# Altium PCB Oct_Ribbon_V2.1_PCB.PcbDoc
Units mil, origin at the board's own origin, x right, y up, seen from the top; angles counter-clockwise.
Board outline 7969.5 x 4201.11 mil, 2 copper layers (Top Layer, Bottom Layer), stack 3.556 mil thick; 9 components, 11 nets, 96 pads, 42 vias.
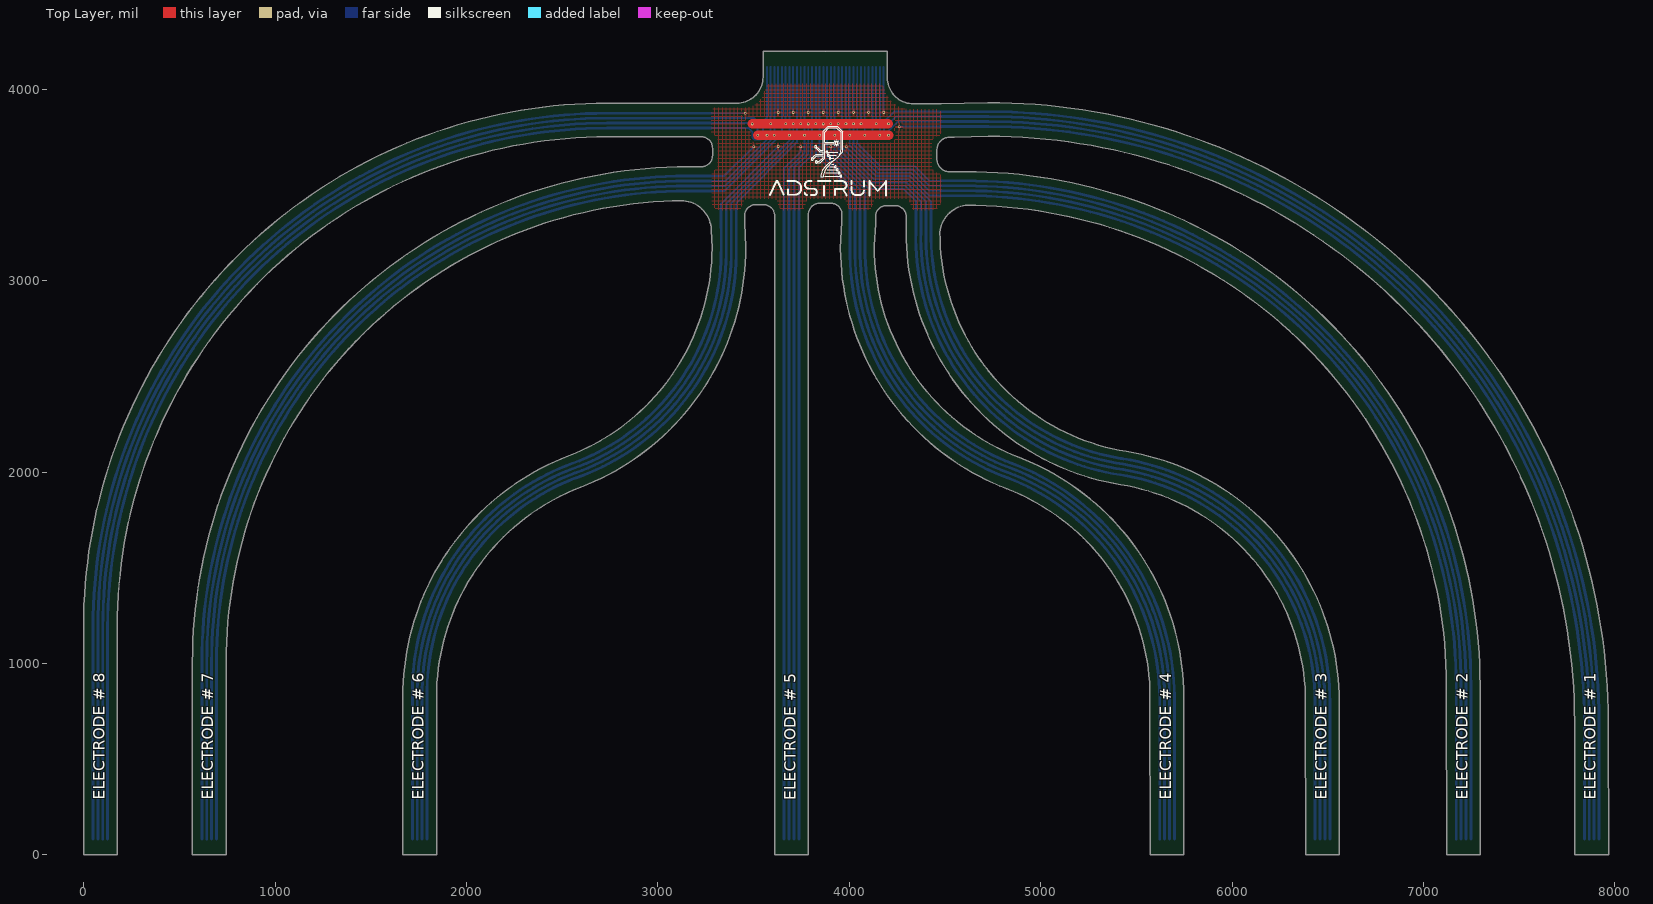
[diagram p0: Top Layer view]
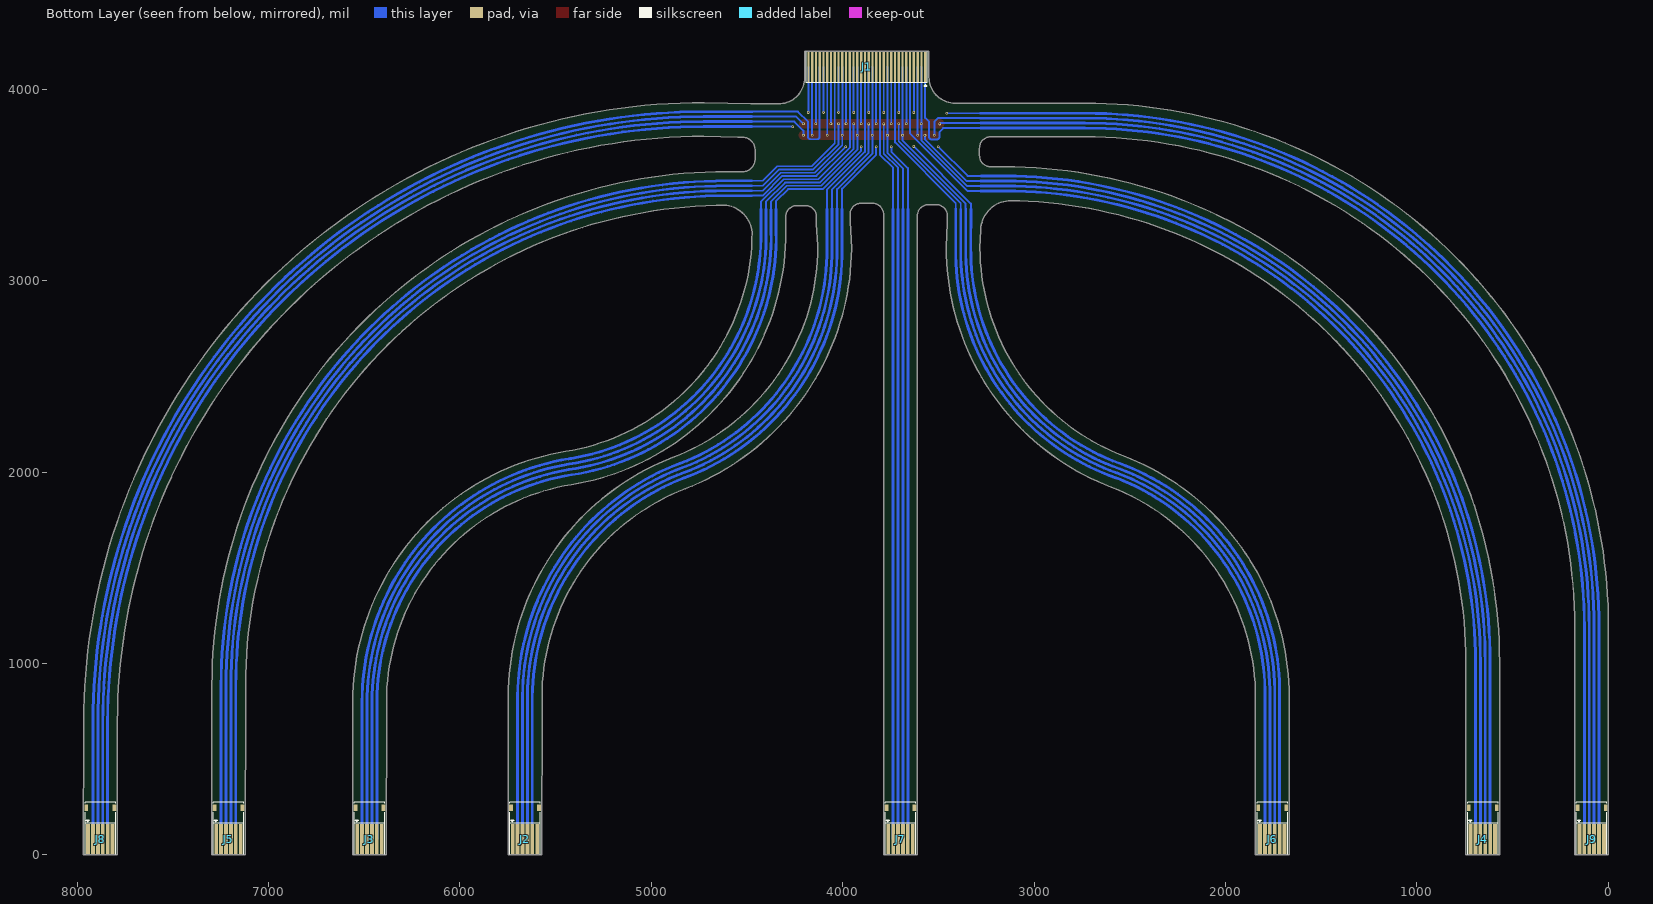
[diagram p1: Bottom Layer view, seen from below]

## Layer stack, top to bottom
Top Solder: solder mask 0.5, Solder Resist, Dk 3.5
Top Layer: signal copper 1.378
Dielectric 1: dielectric 0.8, Flex, Dk 4.8
Bottom Layer: signal copper 1.378
Bottom Solder: solder mask 0.5, Solder Resist, Dk 3.5

## Board outline
743.08,0 743.08,1006.64 cw(c3156.39,1006.64) 3029.41,3416.61 cw(c3135.6,1006.77) 3120.36,3418.9 cw(c3121.35,3261.42) 3278.7,3267.85 3282.62,3171.79 cw(c2116.54,3174.97) 2533.79,2086.08 ccw(c3016.89,825.47) 1666.88,825.51 1666.88,0 1842.86,0 1842.86,825.5 cw(c3016.88,825.47) 2596.76,1921.75 ccw(c2116.54,3174.97) 3458.61,3173.5 3458.61,3175.24 3453.4,3302.84 3452.99,3346.46 cw(c3511.62,3339.41) 3511.62,3398.47 3551.03,3398.47 cw(c3551.03,3339.41) 3609.67,3346.46 3610.09,3344.88 3610.09,3339.88 3610.09,3339.41 3610.09,3323.88 3610.36,0 3786.35,0 3786.07,3310.24 3786.07,3349.92 3786.49,3353.86 cw(c3845.13,3346.82) 3845.13,3405.87 3903.08,3405.87 cw(c3903.08,3346.82) 3961.72,3353.86 3961.39,3310.24 3953.59,3170.34 3953.62,3167.34 ccw(c5310.56,3179.68) 4823.31,1913.18 4823.43,1913.14 cw(c4406.69,825.69) 5571.26,827.67 5572.7,0 5748.68,0 5747.24,827.97 ccw(c4406.69,825.69) 4886.4,2077.47 cw(c5310.56,3179.68) 4151.19,2954.66 cw(c5319.47,3175.16) 4130.56,3175.16 4130.59,3183.58 4136.96,3297.97 4136.96,3334.32 cw(c4196.02,3334.32) 4196.02,3393.38 4238.96,3393.38 cw(c4238.96,3334.32) 4298.02,3334.32 4298.02,3290.7 4297.91,3290.7 4297.39,3253.32 ccw(c5633.83,3253.83) 5419.11,1934.75 cw(c5234.41,800.09) 6384.01,802.1 6385.41,0 6561.39,0 6559.99,802.41 ccw(c5234.41,800.09) 5447.39,2108.45 cw(c5633.83,3253.83) 4473.38,3253.39 cw(c4630.2,3238.95) 4606.86,3394.69 cw(c4607.41,881.5) 7120.6,885.94 7122.16,0 7298.15,0 7296.58,886.25 ccw(c4607.41,881.5) 4606.83,3570.68 4606.83,3570.69 4548.17,3569.73 4519.8,3569.73 cw(c4525.88,3637.78) 4457.56,3637.78 4457.56,3682.72 cw(c4525.88,3682.72) 4519.96,3750.79 4548.17,3750.79 4726.09,3755.33 cw(c4725.78,690.68) 7790.42,696.04 7791.63,0 7967.62,0 7966.4,696.35 ccw(c4725.78,690.68) 4724.88,3931.31 4723.83,3931.31 4479.16,3925.07 4335.09,3925.07 cw(c4335.09,4061.19) 4198.97,4061.19 4198.97,4201.11 3549.25,4201.11 3549.25,4064.99 cw(c3413.13,4064.99) 3413.13,3928.87 2735.15,3928.87 ccw(c2735.1,1191.9) -1.88,1191.9 -1.88,0 174.1,0 174.1,1191.9 cw(c2735.1,1191.9) 2735.15,3752.89 3226.07,3752.89 cw(c3226.07,3693.83) 3285.13,3693.83 3285.13,3654.99 cw(c3226.07,3654.99) 3226.07,3595.94 3156.35,3595.94 ccw(c3156.39,1006.64) 567.1,1006.64 567.1,0

## Design rules (kind name [scope] priority, off if disabled: settings)
Clearance [All] p1: gap=10 ignorepadtopadclearanceinfootprint=FALSE except(0: Arc-Hole Track-Hole SMDPad-Hole THPad-Hole Via-Hole Fill-Hole Poly-Hole Region-Hole Text-Hole; 4: Arc-SMDPad Track-SMDPad SMDPad-SMDPad; 7: Arc-Arc Arc-Track Arc-THPad Arc-Via Arc-Text Track-Track Track-THPad Track-Via Track-Text SMDPad-THPad SMDPad-Via SMDPad-Text THPad-THPad THPad-Via THPad-Text Via-Via Via-Text Fill-Text Poly-Text Region-Text Text-Text)
PolygonConnect [All] p1: connectstyle=Relief reliefconductorwidth=10 reliefentries=4 polygonreliefangle="90 Angle" airgapwidth=10
RoutingVias [All] p1: holewidth=11.81 width=23.62 viastyle="Through Hole" minholewidth=7.87 minwidth=13.78 maxholewidth=31.5 maxwidth=62.99
SilkToSilkClearance [All] p1: silktosilkclearance=0
SilkToSolderMaskClearance [IsPad] p1: minsilkscreentomaskgap=0 clearancetoexposedcopper=TRUE
SolderMaskExpansion [All] p1: expansion=4 istentingtop=FALSE
Width [All] p1: maxlimit=50 minlimit=10 preferedwidth=15 minimp=50.000000 maximp=50.000000 favimp=50.000000
28 further rules are at their usual default settings.

## Components (designator, comment, footprint, x,y, rotation, side; value= is the part's Value field where it differs from the comment)
J1 "32 pin Ribbon Pads" "32 pin Ribbon Pads." 3874.12,4118.1 r180 bottom locked
J2 "For Ribbon Cable" "6 PIN RIBBON PADS 0.65MM PITCH" 5660.5,82.5 r0 bottom locked
J3 "For Ribbon Cable" "6 PIN RIBBON PADS 0.65MM PITCH" 6473,82.5 r0 bottom locked
J4 "For Ribbon Cable" "6 PIN RIBBON PADS 0.65MM PITCH" 654.98,82.5 r0 bottom locked
J5 "For Ribbon Cable" "6 PIN RIBBON PADS 0.65MM PITCH" 7210,82.5 r0 bottom locked
J6 "For Ribbon Cable" "6 PIN RIBBON PADS 0.65MM PITCH" 1754.98,82.5 r0 bottom locked
J7 "For Ribbon Cable" "6 PIN RIBBON PADS 0.65MM PITCH" 3698,82.5 r0 bottom locked
J8 "For Ribbon Cable" "6 PIN RIBBON PADS 0.65MM PITCH" 7879.5,82.5 r0 bottom locked
J9 "For Ribbon Cable" "6 PIN RIBBON PADS 0.65MM PITCH" 86,82.5 r0 bottom locked

## Footprints (in the part's own frame and the unit in brackets; to place one, negate y for a bottom-side part, rotate by r counter-clockwise, add the part's x,y. Pads: shape width x height; smd on the part's side, far side on the other; paste and mask are expansions set on the pad)
"6 PIN RIBBON PADS 0.65MM PITCH" [mm]
  rect 0.5x4 smd: 1(1.625,0) 2(0.975,0) 3(0.325,0) 4(-0.325,0) 5(-0.975,0) 6(-1.625,0)
  silkscreen extent -2.02,-2.51 2.02,2.01
"32 pin Ribbon Pads." [mm]
  rect 0.3x4 smd: 1(7.75,0) 2(7.25,0) 3(6.75,0) 4(6.25,0) 5(5.75,0) 6(5.25,0) 7(4.75,0) 8(4.25,0) 9(3.75,0) 10(3.25,0) 11(2.75,0) 12(2.25,0) 13(1.75,0) 14(1.25,0) 15(0.75,0) 16(0.25,0) 17(-0.25,0) 18(-0.75,0) 19(-1.25,0) 20(-1.75,0) 21(-2.25,0) 22(-2.75,0) 23(-3.25,0) 24(-3.75,0) 25(-4.25,0) 26(-4.75,0) 27(-5.25,0) 28(-5.75,0) 29(-6.25,0) 30(-6.75,0) 31(-7.25,0) 32(-7.75,0)
  silkscreen extent -8.04,-2.54 8.04,2.01

## Part data
J1: "Ribbon wire Connection Pads"
J2 J3 J4 J5 J6 J7 J8 J9: library part "6 pin Ribbon Pads", "Ribbon wire Connection Pads 0.65mm Pitch"

## Free pads (board coordinates)
  rect 20x35 smd far side: ""(12.7,246) ""(159.5,246) ""(581.68,246) ""(728.48,246) ""(1681.68,246) ""(1828.48,246) ""(3624.7,246) ""(3771.5,246) ""(5587.2,246) ""(5734,246) ""(6399.7,246) ""(6546.5,246) ""(7136.7,246) ""(7283.5,246) ""(7806.2,246) ""(7953,246)

## Via types
v1: diameter 13.78, hole 7.87, Top Layer to Bottom Layer, 42 vias

## Nets (pads, with @x,y where several pads share a name; then routed paths per layer and width w, separated by ;. In a path a pad name is that pad's centre, name@x,y a point inside that pad or via, vN(x,y) a via of type N, cw(c..) or ccw(c..) an arc to the next point about the centre after c; other vN are vias at no path point)
GND: J1.4 J1.8 J1.12 J1.16 J1.20 J1.24 J1.28 J1.32 J2.5 J3.5 J4.5 J5.5 J6.5 J7.5 J8.5 J9.5 | length 42232.3
  Bottom Layer w10: 3278,3548 3347.45,3548 v1(3500,3700.55) ; 3280,3876 v1(3457,3876) ; 3330.04,3375.44 3330.04,3404.24 v1(3628.19,3702.39) ; v1@3628.06,3880 J1.4 ; 3659.61,3374.38 3659.61,3589.61 3745.75,3675.75 v1(3745.75,3700.55) ; v1@3706.8,3880 J1.8 ; v1@3785.54,3880 J1.12 ; v1@3824.91,3700 3824.91,3660.09 4003.29,3481.71 4003.29,3375.8 ; v1@3864.28,3880 J1.16 ; v1(3903.78,3700) 3903.78,3680.22 4104,3480 4285,3480 4347.61,3417.39 4347.61,3375.09 ; v1@3943.02,3880 J1.20 ; v1(3984.4,3701.48) 3984.48,3701.48 4137.96,3548 4316.04,3548 4419.04,3445 4475.01,3445 ; v1@4021.76,3880 J1.24 ; v1(4100.5,3880) J1.28 ; v1@4179.24,3880 J1.32 ; v1(4261,3805) 4262,3806 4474.3,3806
  Bottom Layer w15: J9.5 47.88,1191.9 cw(c2733.49,1190.39) 2735,3876 3280,3876 ; J4.5 616.59,1007 cw(c3153.8,1010.8) 3150,3548 3278,3548 ; J6.5 1716.59,831.06 cw(c2994.23,847.3) 2589.64,2059.29 ccw(c2141.08,3161.03) 3330.57,3173.15 3330.04,3375.44 ; J7.5 3659.61,3374.38 ; 4003.29,3375.8 4003.29,3167.18 ccw(c5265.94,3154.52) 4795.5,1982.71 cw(c4380.57,812.46) 5622.11,828.02 J2.5 ; 4347.61,3375.09 4347.61,3253.58 ccw(c5604.74,3229.25) 5379.16,1992.29 cw(c5225.27,792.7) 6434.61,805.97 J3.5 ; 4474.3,3806 4726,3806 cw(c4728.56,693.44) 7841.11,696 J8.5 ; 4475.01,3445 4607,3445 cw(c4609.81,883.19) 7171.61,886 J5.5
  other v1: 3825.04,3700 3628.19,3880 3706.93,3880 3785.67,3880 3864.41,3880 3943.15,3880 4021.89,3880 4179.37,3880
Measure1: J1.1 J9.2 | length 6443
  Bottom Layer w10: 3280,3798 3475,3798 3494,3779 3494,3754 ccw(c3509,3754) 3509,3739 3534,3739 ccw(c3534,3754) 3549,3754 3549,3832 3569,3852 J1.1
  Bottom Layer w15: J9.2 124.39,1192 cw(c2732.69,1189.69) 2735,3798 3280,3798
Measure2: J1.5 J4.2 | length 5759.3
  Bottom Layer w10: 3280,3470 3349.12,3470 3647.74,3768.62 J1.5
  Bottom Layer w15: J4.2 693.36,1007 cw(c3153.18,1010.18) 3150,3470 3280,3470
Measure3: J1.9 J6.2 | length 4859.8
  Bottom Layer w10: 3409.15,3374.73 3409.15,3406.15 3726.48,3723.48 J1.9
  Bottom Layer w15: J6.2 1793.36,827.01 cw(c2999.67,842.68) 2606.36,1983.18 ; 2606.36,1983.18 ccw(c2158.49,3151.02) 3409.15,3168.02 3409.15,3374.73
Measure4: J1.13 J7.2 | length 4064.1
  Bottom Layer w10: 3736.39,3374.38 3736.39,3591.39 3805.22,3660.22 J1.13
  Bottom Layer w15: J7.2 3736.39,3374.38
Measure5: J1.17 J2.2 | length 4802.1
  Bottom Layer w10: J1.17 3883.96,3674.04 4082.5,3475.5 4082.5,3375.09
  Bottom Layer w15: 4082.5,3375.09 4082.5,3167.92 ccw(c5278.21,3161.68) 4815.13,2059.26 cw(c4383.44,816.59) 5698.89,831 J2.2
Measure6: J1.21 J3.2 | length 5387.2
  Bottom Layer w10: J1.21 3962.7,3696.47 4128.17,3531 4309,3531 4427.08,3412.92 4427.08,3374.38
  Bottom Layer w15: 4427.08,3374.38 4427.08,3255.87 ccw(c5608.87,3238.71) 5416.57,2072.54 cw(c5224.21,799.82) 5432.91,2069.97 cw(c5224.21,799.82) 6511.39,802.01 J3.2
Measure7: J1.25 J5.2 | length 5995.2
  Bottom Layer w10: J1.25 4041.44,3718.56 4161,3599 4341,3599 4417,3523 4475.72,3523
  Bottom Layer w15: 4475.72,3523 4607,3523 cw(c4609.19,883.81) 7248.39,886 J5.2
Measure8: J1.29 J8.2 | length 6709.3
  Bottom Layer w10: J1.29 4120.18,3753.82 ccw(c4134,3753.82) 4134,3740 4167.25,3740 ccw(c4167.25,3753.75) 4181,3753.75 4181,3831 4234,3884 4474.3,3884
  Bottom Layer w15: 4474.3,3884 4726,3884 cw(c4727.94,694.06) 7917.89,696 J8.2
VCC_3V3: J1.3 J1.7 J1.11 J1.15 J1.19 J1.23 J1.27 J1.31 J2.4 J3.4 J4.4 J5.4 J6.4 J7.4 J8.4 J9.4 | length 44509.6
  Top Layer w50: v1@3521.89,3760 v1(3608.65,3760) v1(3687.24,3760) v1(3765.98,3760) v1(3844.72,3760) v1(3923.46,3760) v1(4002.2,3760) v1@4158,3760 ; v1@4160,3760 v1(4205,3760)
  Bottom Layer w10: 3280,3522 3353.04,3522 3569.28,3738.24 3569.28,3759.28 v1(3570,3760) ; 3280,3850 3503,3850 3521,3832 v1(3521,3760.89) ; 3357.23,3374.73 3357.23,3403.23 3687.24,3733.24 v1(3687.24,3760) ; J1.3 3608.52,4117.95 v1@3608.52,3760 ; 3685.2,3375.09 3685.2,3588.29 3765.98,3669.07 3765.98,3759.87 3765.85,3760 3765.92,3760.07 J1.11 J1.11 ; v1@3687.11,3760 J1.7 ; J1.15 3844.66,4118.03 3844.66,3760.07 3844.59,3760 3844.72,3759.87 3844.72,3664.32 4029.59,3479.45 4029.59,3377.92 ; v1@3923.23,3759.77 3923.46,3759.54 3923.46,3685.54 4112,3497 4293,3497 4373.83,3416.17 4373.83,3373.67 ; 3923.33,3830 J1.19 ; v1(3923.46,3760) 3923.46,3827.46 ; J1.23 4002.07,3760 4002.2,3759.87 4002.2,3733.39 4002.2,3707.8 4145,3565 4325,3565 4419,3471 4475.72,3471 ; v1@4080.81,3760 J1.27 ; v1(4159,3761) 4159.55,3761.55 J1.31 ; v1(4205,3760) 4205.3,3760.3 4205.3,3785.3 4252,3832 4474.3,3832
  Bottom Layer w15: J9.4 73.2,1192 cw(c2733.1,1190.1) 2735,3850 3280,3850 ; J4.4 642.18,1007 cw(c3153.59,1010.59) 3150,3522 3280,3522 ; J6.4 1742.18,828.03 cw(c2997.06,844.09) 2589.41,2031.02 ccw(c2146.78,3157.77) 3357.23,3174.59 3357.23,3374.73 ; J7.4 3685.2,3375.09 ; 4029.59,3377.92 4029.59,3167.95 ccw(c5270.19,3157.24) 4792.75,2012.15 cw(c4383.83,816.16) 5647.7,830.98 J2.4 ; 4373.83,3373.67 4373.83,3256.62 ccw(c5605.18,3232.69) 5393.29,2019.48 cw(c5223.1,794.13) 6460.2,798.24 J3.4 ; 4474.3,3832 4726,3832 cw(c4728.35,693.65) 7866.7,696 J8.4 ; 4475.72,3471 4607.01,3471 cw(c4609.6,883.4) 7197.2,886 J5.4
  other v1: 4080.94,3760
VREF: J1.2 J1.6 J1.10 J1.14 J1.18 J1.22 J1.26 J1.30 J2.3 J3.3 J4.3 J5.3 J6.3 J7.3 J8.3 J9.3 | length 44285.9
  Top Layer w50: v1(3492,3820) 3492.3,3820.3 v1(3667.56,3820.3) ; v1@3667.56,3820 v1(3785.67,3820) v1(3864.41,3820) 4204.3,3820 v1@4204.3,3820.3
  Bottom Layer w10: 3280,3496 3351.08,3496 3588.89,3733.81 v1(3588.89,3820.3) 3588.79,3820.4 3588.79,4118 J1.2 ; 3280,3824 3488,3824 v1(3492,3820) ; 3383.29,3374.38 3383.29,3405.25 3706.93,3728.89 v1@3706.93,3820.17 ; v1@3667.43,3820.3 J1.6 ; 3710.8,3374.38 3710.8,3589.84 3785.67,3664.71 v1@3785.67,3819.87 ; v1@3746.17,3820.3 J1.10 ; v1@3824.91,3820.3 J1.14 ; v1@3864.28,3820 3864.41,3819.87 3864.41,3668.67 4056.16,3476.92 4056.16,3377.21 ; v1@3903.65,3820.3 J1.18 ; v1@3943.15,3820.17 3943.15,3690.85 4120,3514 4301,3514 4400.1,3414.9 4400.1,3374.38 ; v1@3982.39,3820.3 J1.22 ; v1@4021.76,3820.3 4021.76,3714.2 4153.96,3582 4332.04,3582 4417.04,3497 4475.72,3497 ; v1@4061.13,3820.3 J1.26 ; v1@4139.87,3820.3 J1.30 ; v1(4205,3820.3) 4242.7,3858 4474.3,3858
  Bottom Layer w15: J9.3 98.8,1192 cw(c2732.9,1189.9) 2735,3824 3280,3824 ; J4.3 667.77,1007.42 cw(c3153.68,1010.09) 3151,3496 3280,3496 ; J6.3 1767.77,828.03 cw(c2997.86,843.89) 2600.93,2008.28 ccw(c2152.69,3154.37) 3383.29,3161.69 3383.29,3374.38 ; J7.3 3710.8,3374.38 ; 4056.16,3377.21 4056.16,3166.45 ccw(c5274.8,3159.72) 4796.69,2038.76 cw(c4385.6,818.36) 5673.3,832.96 J2.3 ; 4400.1,3374.38 4400.1,3255.16 ccw(c5608.05,3236.85) 5393.62,2047.94 cw(c5223.87,800.17) 6172.69,1628.11 cw(c5215.72,793.06) 6485.8,792.24 J3.3 ; 4474.3,3858 4726,3858 cw(c4728.15,693.85) 7892.3,696 J8.3 ; 4475.72,3497 4607,3497 cw(c4609.4,883.6) 7222.8,886 J5.3
  other v1: 3706.93,3820.3 3746.3,3820.3 3825.04,3820.3 3903.78,3820.3 3943.15,3820.3 3982.52,3820.3 4021.89,3820.3 4061.26,3820.3 4140,3820.3
pads on no net: J2.1 J2.6 J3.1 J3.6 J4.1 J4.6 J5.1 J5.6 J6.1 J6.6 J7.1 J7.6 J8.1 J8.6 J9.1 J9.6

## Polygon pours and split planes (outlines as drawn)
GND on Top Layer "GND_L01_P000" (hatched 90Degree grid 20 track 5, pour order 0): 3278.7,3884.7 cw(c3297.8,3884.7) 3297.8,3903.8 3426.86,3903.8 ccw(c3443.56,4020.47) 3560.28,4004.07 cw(c3589.99,4000) 3590,4030 4157,4030 cw(c4144.86,3985.36) 4181.4,4013.74 ccw(c4319.53,4036.5) 4340,3898 4457.56,3898 cw(c4459.79,3877.79) 4480,3880 4480,3810 4480,3780 cw(c4450.06,3779.97) 4471.25,3758.82 ccw(c4471.37,3717.45) 4430,3717.43 4430,3608.14 ccw(c4469.96,3604.09) 4466.1,3564.1 cw(c4456.76,3541.49) 4479.38,3550.83 4479.38,3525.25 cw(c4434.93,3520.62) 4479.62,3520.38 4479.62,3483.9 cw(c4461.34,3480.13) 4480,3480 4480,3420 cw(c4430.02,3419.98) 4430,3370 4350,3370 cw(c4349.99,3399.99) 4320,3400 ccw(c4290.01,3400.01) 4290,3430 4140,3430 ccw(c4149.97,3403.56) 4121.77,3401.77 cw(c4090.02,3401.75) 4090,3370 4020,3370 cw(c4019.99,3401.77) 3988.23,3401.77 ccw(c3959.05,3402.25) 3968.06,3430 3800,3430 ccw(c3799.98,3400.02) 3770,3400 cw(c3740.02,3399.98) 3740,3370 3660,3370 cw(c3659.99,3399.99) 3630,3400 ccw(c3600.01,3400.01) 3600,3430 3470,3430 ccw(c3469.98,3400.02) 3440,3400 cw(c3410.02,3399.98) 3410,3370 3330,3370 cw(c3329.99,3419.99) 3280,3420 3280,3560 cw(c3300,3560) 3285.86,3574.14 ccw(c3282.43,3604.71) 3313,3608.14 3313,3733 ccw(c3281.22,3733.82) 3291.2,3764 cw(c3301.13,3784.42) 3278.7,3788 3278.7,3810

## Silkscreen, mask and mechanical layers (free items; w line width, h text height)
Top Overlay:
  circle w5: c3824.54,3700.69 r6
  circle w5: c3806.6,3636.39 r6
  circle w5: c3827.86,3621.37 r6
  circle w5: c3926.94,3595.47 r5
  circle w5: c3937.93,3580.55 r5
  circle w5: c3946.57,3564.07 r5
  circle w5: c3955.99,3547.58 r5
  circle w5: c3932.99,3719.5 r7.5
  circle w5: c3882.65,3673.19 r5
  circle w5: c3889.65,3656.7 r5
  circle w5: c3898.97,3641 r5
  lines w3: 3874.11,4201.11 3874.11,4201.11
  lines w5: 3806.6,3642.39 3817.6,3653.39 3826.6,3662.39 3862.6,3662.39 3862.6,3674.54 3847.5,3674.54 3844.45,3674.54 3837.6,3681.39 3826.6,3693.39 ; 3812.6,3636.39 3830.36,3654.15 3830.51,3654.15 3862.6,3654.15 3862.6,3643.66 3843.45,3624.51 3833.6,3624.51 ; 3831.6,3699.39 3847.78,3682.21 ; 3833.6,3617.28 3847.49,3617.28 3861.6,3631.39 3870.65,3640.44 3870.65,3645.36 3870.65,3715.39 3917.92,3715.39 3919.07,3716.55 ; 3855.61,3682.21 3847.78,3682.21 ; 3871.72,3547.58 3950.99,3547.58 ; 3876.43,3564.07 3941.57,3564.07 ; 3884.28,3579.77 3932.99,3579.77 ; 3887.65,3673.19 3940.8,3673.19 ; 3894.65,3656.7 3932.95,3656.7 ; 3898.41,3595.47 3921.94,3595.47 ; 3903.97,3641 3918.03,3641 ; 3909.4,3609.6 3919.6,3609.6 ; 3918.98,3717.03 cw(c3932.99,3719.5) 3918.98,3721.97 ; 3919.07,3722.46 3919,3722.39 3918,3723.39 3870.65,3723.39 3870.65,3777.44 3893.6,3800.39 3932.76,3800.39 3956.89,3775.77 3956.89,3685.75 cw(c3905.34,3685.75) 3941.8,3649.3 ; 3921.52,3711.47 ccw(c3932.99,3719.5) 3924.96,3708.04 ; 3921.52,3727.53 cw(c3932.99,3719.5) 3924.96,3730.97 ; 3926.27,3635.48 3897.52,3619.58 3873.93,3597.57 ccw(c3927.85,3543.65) 3851.6,3543.65 3864.65,3543.65 cw(c3939.51,3543.65) 3886.58,3596.59 3911.36,3621.37 3941.59,3648.85 ; 3930.52,3705.5 ccw(c3932.99,3719.5) 3935.46,3705.5 ; 3930.52,3733.51 cw(c3932.99,3719.5) 3935.46,3733.51 ; 3941.02,3708.04 ccw(c3932.99,3719.5) 3944.46,3711.47 ; 3941.02,3730.97 cw(c3932.99,3719.5) 3944.46,3727.53 ; 3941.91,3649.18 3958.86,3666.13 ccw(c3942.6,3682.39) 3965.6,3682.39 3965.6,3743.39 3965.6,3779.39 3960.6,3784.39 3936.6,3808.39 3889.6,3808.39 3862.6,3781.39 3862.6,3682.21 3847.77,3682.21 ; 3947,3717.03 ccw(c3932.99,3719.5) 3947,3721.97
  lines w10: 3585.71,3449.36 3620.25,3521.58 3624.18,3521.58 3657.15,3450.14 ; 3677.08,3521.58 3711.62,3521.58 cw(c3711.62,3484.63) 3748.57,3484.63 ; 3679.04,3478.4 3679.04,3450.14 3710.05,3450.14 3715.57,3450.14 ccw(c3715.57,3483.11) 3748.54,3483.11 3748.54,3484.63 ; 3766.97,3461.92 ccw(c3780.31,3461.92) 3780.31,3448.57 ; 3799.54,3448.57 3815.25,3448.57 ccw(c3815.25,3463.49) 3830.16,3463.49 3830.16,3465.06 ccw(c3813.68,3465.06) 3813.68,3481.54 3788.95,3481.54 cw(c3788.95,3501.95) 3768.54,3501.95 cw(c3788.16,3501.95) 3788.16,3521.58 3802.68,3521.58 ; 3835.47,3521.58 3902.2,3521.58 ; 3868.84,3446.22 3868.84,3495.36 ; 3923.58,3521.58 3962.83,3521.58 cw(c3962.83,3499.6) 3984.82,3499.6 cw(c3965.19,3499.6) 3965.19,3479.97 ; 3925.94,3447.79 3925.94,3479.97 3959.69,3479.97 3965.19,3479.97 ; 3986.01,3446.81 3965.19,3479.97 ; 4012.29,3472.12 ccw(c4036.63,3472.12) 4036.63,3447.79 4044.09,3447.79 4049.58,3447.79 ; 4012.29,3472.91 4012.29,3491.36 ; 4012.29,3505.36 4012.29,3521.58 ; 4050.76,3447.79 ccw(c4050.76,3472.91) 4075.88,3472.91 ; 4075.88,3493.36 4075.88,3521.58 ; 4105.32,3447 4105.32,3520.79 4148.89,3469.77 4192.46,3520.79 4192.07,3447
  text "ELECTRODE # 8" at 130.21,289.33 h100 r90
  text "ELECTRODE # 7" at 698.21,289.33 h100 r90
  text "ELECTRODE # 6" at 1798.21,289.33 h100 r90
  text "ELECTRODE # 3" at 6516.21,289.33 h100 r90
  text "ELECTRODE # 2" at 7253.21,289.33 h100 r90
  text "ELECTRODE # 1" at 7921.21,289.33 h100 r90
  text "ELECTRODE # 4" at 5704.21,287.5 h100 r90
  text "ELECTRODE # 5" at 3741.21,286.55 h100 r90
Bottom Overlay:
  lines w5: 6.45,3.5 6.45,166.5 ; 6.45,222.25 6.45,166.5 ; 6.45,270 6.45,275 165.3,275 165.3,270 ; 165.55,3.5 165.55,166.5 6.45,166.5 ; 165.55,160.5 165.55,222.35 ; 575.43,166.5 575.43,222.25 ; 575.43,270 575.43,275 734.28,275 734.28,270 ; 734.53,160.5 734.53,222.35 ; 1675.43,166.5 1675.43,222.25 ; 1675.43,270 1675.43,275 1834.28,275 1834.28,270 ; 1834.53,160.5 1834.53,222.35 ; 3618.45,166.5 3618.45,222.25 ; 3618.45,270 3618.45,275 3777.3,275 3777.3,270 ; 3777.55,160.5 3777.55,222.35 ; 5580.95,166.5 5580.95,222.25 ; 5580.95,270 5580.95,275 5739.8,275 5739.8,270 ; 5740.05,160.5 5740.05,222.35 ; 6393.45,166.5 6393.45,222.25 ; 6393.45,270 6393.45,275 6552.3,275 6552.3,270 ; 6552.55,160.5 6552.55,222.35 ; 7130.45,166.5 7130.45,222.25 ; 7130.45,270 7130.45,275 7289.3,275 7289.3,270 ; 7289.55,160.5 7289.55,222.35 ; 7799.95,166.5 7799.95,222.25 ; 7799.95,270 7799.95,275 7958.8,275 7958.8,270 ; 7959.05,160.5 7959.05,222.35
Board Outline:
  lines w0.5: 3874.11,4201.11 4026.38,4201.11 ; 4297.39,3253.32 4297.91,3290.7 4298.02,3290.7 4298.02,3334.32 ccw(c4238.96,3334.32) 4238.96,3393.38 4196.02,3393.38 ccw(c4196.02,3334.32) 4136.96,3334.32 4136.96,3297.97 4130.59,3183.58 4130.56,3175.16 ccw(c5319.47,3175.16) 4151.19,2954.66 ccw(c5310.56,3179.68) 4886.4,2077.47 cw(c4406.69,825.69) 5747.24,827.97 5748.68,0 5572.7,0 5571.26,827.67 ccw(c4406.69,825.69) 4823.43,1913.14 4823.31,1913.18 cw(c5310.56,3179.68) 3953.62,3167.34 3953.59,3170.34 3961.39,3310.24 3961.72,3353.86 ccw(c3903.08,3346.82) 3903.08,3405.87 3845.13,3405.87 ccw(c3845.13,3346.82) 3786.49,3353.86 3786.07,3349.92 3786.07,3310.24 ; 4297.39,3253.32 ccw(c5633.83,3253.83) 5419.11,1934.75 cw(c5234.41,800.09) 6384.01,802.1 6385.41,0 6561.39,0 6559.99,802.41 ccw(c5234.41,800.09) 5447.39,2108.45 cw(c5633.83,3253.83) 4473.38,3253.39 cw(c4630.2,3238.95) 4606.86,3394.69 cw(c4607.41,881.5) 7120.6,885.94 7122.16,0 7298.15,0 7296.58,886.25 ccw(c4607.41,881.5) 4606.83,3570.68 4548.17,3569.73 4519.8,3569.73 cw(c4525.88,3637.78) 4457.56,3637.78 4457.56,3682.72 cw(c4525.88,3682.72) 4519.96,3750.79 4548.17,3750.79 4726.09,3755.33 cw(c4725.78,690.68) 7790.42,696.04 7791.63,0 7810.94,0 7967.62,0 7966.4,696.35 ccw(c4725.78,690.68) 4724.88,3931.31 4723.83,3931.31 4479.16,3925.07 4335.09,3925.07 cw(c4335.09,4061.19) 4198.97,4061.19 4198.97,4201.11 3549.25,4201.11 3549.25,4064.99 cw(c3413.13,4064.99) 3413.13,3928.87 2735.15,3928.87 ccw(c2735.1,1191.9) -1.88,1191.9 -1.88,0 174.1,0 174.1,1191.9 cw(c2735.1,1191.9) 2735.15,3752.89 3226.07,3752.89 cw(c3226.07,3693.83) 3285.13,3693.83 3285.13,3654.99 cw(c3226.07,3654.99) 3226.07,3595.94 3156.35,3595.94 ccw(c3156.39,1006.64) 567.1,1006.64 567.1,0 743.08,0 743.08,1006.64 cw(c3156.39,1006.64) 3029.41,3416.61 cw(c3135.6,1006.82) 3120.36,3418.9 cw(c3121.35,3261.42) 3278.7,3267.85 3282.62,3171.79 cw(c2116.54,3174.97) 2533.79,2086.08 ; 2533.79,2086.08 ccw(c3016.88,825.47) 1666.88,825.51 1666.88,0 1842.86,0 1842.86,825.5 cw(c3016.88,825.47) 2596.76,1921.75 ccw(c2116.54,3174.97) 3458.61,3173.5 3458.61,3175.24 3453.4,3302.84 3452.99,3346.46 cw(c3511.62,3339.41) 3511.62,3398.47 3551.03,3398.47 cw(c3551.03,3339.41) 3609.67,3346.46 3610.09,3344.88 3610.09,3339.88 3610.09,3339.41 3610.09,3323.88 3610.36,0 3786.35,0 3786.07,3310.24 ; 2533.79,2086.08 2533.79,2086.08 ; 3786.07,3310.24 3786.07,3310.24
Fabrication:
  drawing of 1497 lines, arcs and shapes, not listed
  text "Stiffener Area" at 5129,5035 h60
  text "Material : Polyimide" at 4969,4950.99 h60
  text "Layer" at 8683.09,4912.99 h60
  text "Name" at 9093,4912.99 h60
  text "Material" at 10022.74,4912.99 h60
  text "Thickness" at 10882.51,4912.99 h60
  text "Constant" at 11532.35,4912.99 h60
  text "Board Layer Stack" at 12102.21,4912.99 h60
  text "Top Overlay" at 9093,4792.99 h60
  text "Top Solder" at 9093,4672.99 h60
  text "Solder Resist" at 10022.74,4672.99 h60
  text "0.013mm" at 10882.51,4672.99 h60
  text "3.5" at 11532.35,4672.99 h60
  text "1" at 8683.09,4552.99 h60
  text "Top Layer" at 9093,4552.99 h60
  text "0.035mm" at 10882.51,4552.99 h60
  text "Dielectric 1" at 9093,4432.99 h60
  text "Flex" at 10022.74,4432.99 h60
  text "0.020mm" at 10882.51,4432.99 h60
  text "4.8" at 11532.35,4432.99 h60
  text "2" at 8683.09,4312.99 h60
  text "Bottom Layer" at 9093,4312.99 h60
  text "0.035mm" at 10882.51,4312.99 h60
  text "Bottom Solder" at 9093,4192.99 h60
  text "Solder Resist" at 10022.74,4192.99 h60
  text "0.013mm" at 10882.51,4192.99 h60
  text "3.5" at 11532.35,4192.99 h60
  text "Bottom Overlay" at 9093,4072.99 h60
  text "Total board thickness:" at 8683.09,3952.99 h60
  text "0.116mm" at 10882.51,3952.99 h60
  text "Material : Polyimide" at 1009.01,343 h60 r90
  text "Stiffener Area" at 917,341 h60 r90
  text "Material : Polyimide" at 452.98,339.5 h60 r90
  text "Material : Polyimide" at 2122.98,339.5 h60 r90
  text "Material : Polyimide" at 4065.98,339.5 h60 r90
  text "Material : Polyimide" at 6027.98,339.5 h60 r90
  text "Material : Polyimide" at 6840.98,339.5 h60 r90
  text "Material : Polyimide" at 7577.98,339.5 h60 r90
  text "Material : Polyimide" at 8246.98,339.5 h60 r90
  text "Stiffener Area" at 360.97,337.5 h60 r90
  text "Stiffener Area" at 2030.97,337.5 h60 r90
  text "Stiffener Area" at 3973.97,337.5 h60 r90
  text "Stiffener Area" at 5935.97,337.5 h60 r90
  text "Stiffener Area" at 6748.97,337.5 h60 r90
  text "Stiffener Area" at 7485.97,337.5 h60 r90
  text "Stiffener Area" at 8154.97,337.5 h60 r90
Drill Drawing:
  lines w10: 572.31,5886 638.98,5886 638.98,5952.67 572.31,5952.67 572.31,5886
  lines w15: 512.52,5841 13157,5841 ; 512.52,5991 13157,5991 ; 1063.4,5691 1063.4,6141 ; 1603.26,5691 1603.26,6141 ; 2642.96,5691 2642.96,6141 ; 3148.83,5691 3148.83,6141 ; 3882.64,5691 3882.64,6141 ; 5382.19,5691 5382.19,6141 ; 5972.03,5691 5972.03,6141 ; 6717.83,5691 6717.83,6141 ; 7367.66,5691 7367.66,6141 ; 8221.42,5691 8221.42,6141 ; 9555.03,5691 9555.03,6141 ; 10888.64,5691 10888.64,6141 ; 11754.4,5691 11754.4,6141 ; 512.52,5691 13157,5691 13157,6141 512.52,6141 512.52,5691
  text "Symbol" at 602.52,6036 h72
  text "Count" at 1108.4,6036 h72
  text "Hole Size" at 1648.26,6036 h72
  text "Plated" at 2687.96,6036 h72
  text "Hole Type" at 3193.83,6036 h72
  text "Drill Layer Pair" at 3927.64,6036 h72
  text "Via/Pad" at 5427.19,6036 h72
  text "Pad Shape" at 6017.03,6036 h72
  text "Template" at 6762.83,6036 h72
  text "Description" at 7412.66,6036 h72
  text "Hole Tolerance (+)" at 8266.42,6036 h72
  text "Hole Tolerance (-)" at 9600.03,6036 h72
  text "Hole Length" at 10933.64,6036 h72
  text "Routed Path Length" at 11799.4,6036 h72
  text "42" at 1108.4,5886 h60
  text "7.87mil (0.200mm)" at 1648.26,5886 h60
  text "PTH" at 2687.96,5886 h60
  text "Round" at 3193.83,5886 h60
  text "Top Layer - Bottom Layer" at 3927.64,5886 h60
  text "Via" at 5427.19,5886 h60
  text "Rounded" at 6017.03,5886 h60
  text "v35h20" at 6762.83,5886 h60
  text "-" at 10933.64,5886 h60
  text "-" at 11799.4,5886 h60
  text "42 Total" at 1108.4,5736 h60

## Dimensions
7972.5,0 to 7997.97,275.5 on Fabrication
7303.5,0 to 7328.97,275.5 on Fabrication
6566.5,0 to 6591.97,275.5 on Fabrication
5753.5,0 to 5778.97,275.5 on Fabrication
3791.5,0 to 3816.97,275.5 on Fabrication
1848.5,0 to 1873.97,275.5 on Fabrication
178.5,0 to 203.97,275.5 on Fabrication
5859.81,5416.8 to 6141.64,4338.56 on Fabrication
4670.38,5144.56 to 6394,5146.98 on Fabrication
734.53,3.5 to 760,279 on Fabrication
3557.43,4034.1 to 3557.43,4197.1 on Dimension
4198.97,4201.11 to 3549.25,4201.11 on Dimension
4179.24,4118.1 to 3569,4118.1 on Dimension